# Altium PCB EEM_FMC_Carrier.PcbDoc (part 7 of 19)
Units mm, origin at the board's own origin, x right, y up, seen from the top; angles counter-clockwise.
Board outline 222.9 x 100 mm, 6 copper layers (TopLayer, MidLayer1, MidLayer2, SignalLayer1, Internal Plane 1, BottomLayer), stack 1.528 mm thick; 790 components, 743 nets, 3570 pads, 2277 vias.
Unrouted connection lines stored in the file: 3.
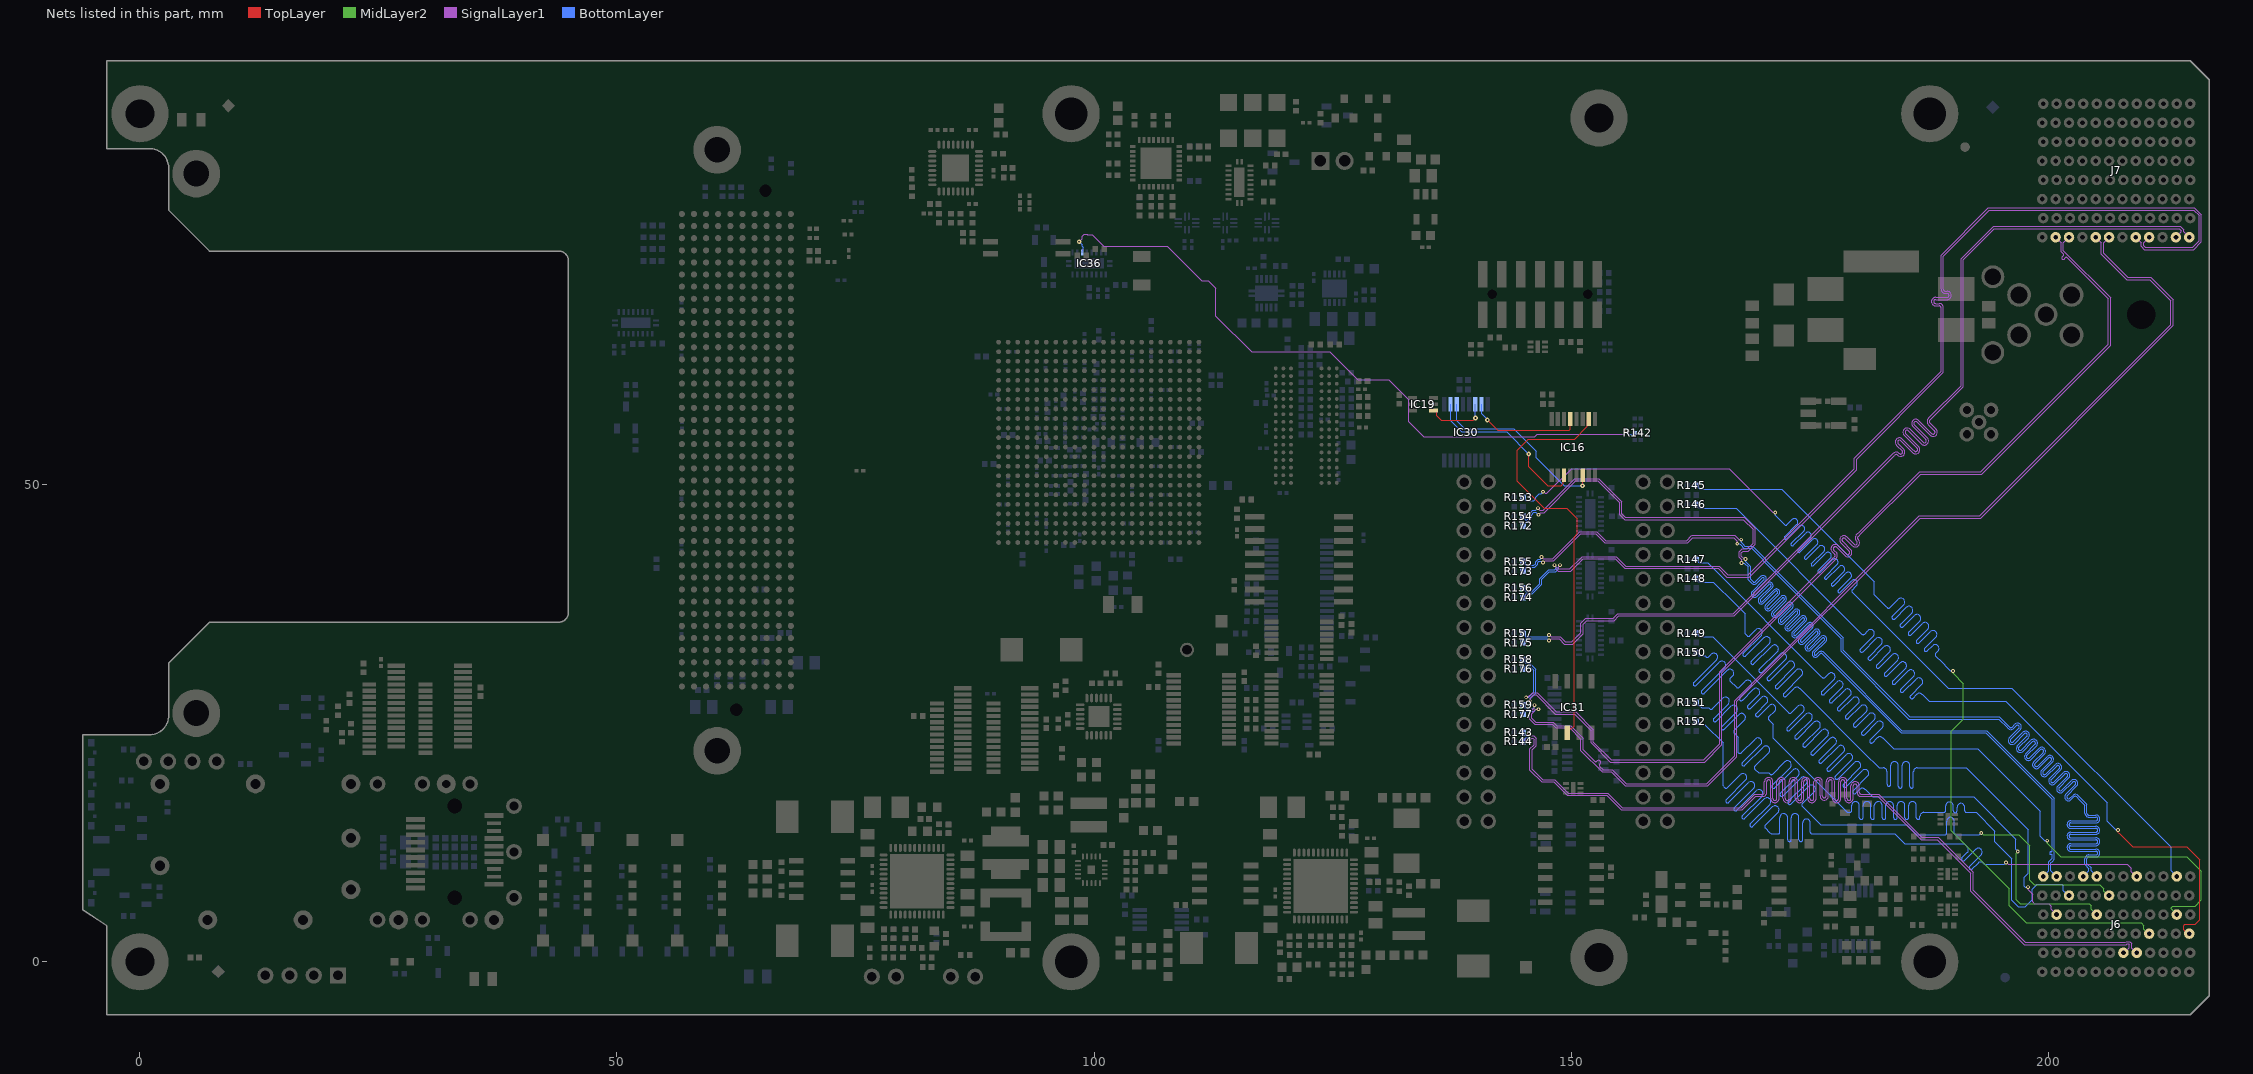
[diagram p9: the nets of this part, all layers, seen from the top]

## Via types
v1: diameter 0.4, hole 0.2, TopLayer to BottomLayer, tented both sides, 1032 vias
v2: diameter 0.5, hole 0.2, TopLayer to BottomLayer, tented both sides, 979 vias
v3: diameter 0.5, hole 0.2, TopLayer to BottomLayer, 162 vias
v4: diameter 0.8, hole 0.5, TopLayer to BottomLayer, tented both sides, 102 vias
v5: diameter 0.6, hole 0.3, TopLayer to BottomLayer, tented both sides, 2 vias

## Nets (pads, with @x,y where several pads share a name; then routed paths per layer and width w, separated by ;. In a path a pad name is that pad's centre, name@x,y a point inside that pad or via, vN(x,y) a via of type N, cw(c..) or ccw(c..) an arc to the next point about the centre after c; other vN are vias at no path point) (continued)
BP_IO.LVDS_N9: J6.L6 R172.1 | length 126.4
  SignalLayer1 w0.11: v1(146.608,46.865) 146.608,46.888 146.809,47.089 147.199,47.089 150.51,50.4 152.825,50.4 155.088,48.137 155.088,46.888 155.612,46.363 168.062,46.363 169.1,45.325 169.1,43.885 168.49,43.275 167.95,43.275 167.633,42.958 167.633,42.392 167.876,42.149 167.876,41.803 v1(167.874,41.801)
  BottomLayer w0.085: R172.1@144.968,45.7 145.215,45.947 145.215,46.044 145.265,46.094 145.442,46.094 145.875,46.527 145.875,46.875 146.102,47.102 146.329,47.102 146.565,46.865 v1(146.608,46.865) ; v1(167.874,41.801) 167.877,41.797 168.151,41.797 168.563,41.386 168.563,40.062 168.85,39.775 168.954,39.671 ccw(c169.206,39.921) 169.456,39.67 170.025,40.239 cw(c170.126,40.138) 170.227,40.239 cw(c170.126,40.138) 170.227,40.037 ; 170.226,40.037 169.001,38.811 ccw(c169.252,38.561) 169.467,38.279 169.471,38.279 170.728,39.536 cw(c170.829,39.435) 170.93,39.536 cw(c170.829,39.435) 170.93,39.334 169.704,38.109 ccw(c169.954,37.858) 170.17,37.576 170.174,37.576 171.431,38.833 cw(c171.532,38.733) 171.633,38.833 cw(c171.532,38.733) 171.632,38.632 ; 171.632,38.631 170.407,37.406 ccw(c170.657,37.155) 170.407,36.904 ccw(c170.657,37.155) 170.872,36.873 170.877,36.873 172.134,38.13 cw(c172.235,38.03) 172.336,38.13 cw(c172.235,38.03) 172.335,37.929 ; 172.335,37.928 171.109,36.703 ccw(c171.36,36.452) 171.575,36.17 171.58,36.17 172.837,37.428 cw(c172.938,37.327) 173.038,37.428 cw(c172.938,37.327) 173.038,37.226 ; 173.038,37.225 171.812,36 ccw(c172.063,35.749) 172.278,35.468 172.283,35.468 173.54,36.725 cw(c173.641,36.624) 173.741,36.725 cw(c173.641,36.624) 173.741,36.523 ; 173.74,36.522 172.515,35.297 ccw(c172.766,35.046) 172.981,34.765 172.985,34.765 174.243,36.022 cw(c174.343,35.921) 174.444,36.022 cw(c174.343,35.921) 174.444,35.82 ; 174.443,35.82 173.218,34.594 ccw(c173.469,34.344) 173.218,34.093 ccw(c173.469,34.344) 173.684,34.062 173.688,34.062 174.945,35.319 cw(c175.046,35.218) 175.147,35.319 cw(c175.046,35.218) 175.147,35.117 ; 175.146,35.117 173.921,33.891 ccw(c174.172,33.641) 174.387,33.359 174.391,33.359 175.648,34.616 cw(c175.749,34.515) 175.85,34.616 cw(c175.749,34.515) 175.85,34.414 174.624,33.189 ccw(c174.874,32.938) 175.09,32.656 175.094,32.656 176.351,33.913 cw(c176.452,33.813) 176.553,33.913 cw(c176.452,33.813) 176.552,33.712 ; 176.552,33.711 175.37,32.529 ccw(c175.62,32.278) 175.871,32.027 176.134,32.29 cw(c176.234,32.189) 176.335,32.29 176.925,31.7 180.275,28.35 184.6,24.025 193.475,24.025 195.625,21.875 200.463,17.037 200.463,12.01 200.463,11.682 cw(c200.321,11.682) 200.321,11.54 200.3,11.54 ccw(c200.3,11.397) 200.157,11.397 ccw(c200.3,11.397) 200.3,11.255 200.321,11.255 cw(c200.321,11.112) 200.463,11.112 200.463,10.856 200.463,10.838 200.094,10.469 200.094,9.544 J6.L6@199.5,8.95
BP_IO.LVDS_N10: J6.I6 R173.1 | length 129.6
  SignalLayer1 w0.11: v1(147.067,41.851) 147.095,41.851 147.276,42.032 148.207,42.032 151.025,44.85 152.615,44.85 153.55,43.915 162.24,43.915 162.775,44.45 167.05,44.45 167.267,44.233 167.401,44.099 167.401,43.843 v1(167.421,43.823)
  BottomLayer w0.085: R173.1@144.968,40.95 145.215,41.197 145.215,41.294 145.265,41.344 145.425,41.344 145.513,41.344 146.194,41.344 146.497,41.647 146.497,41.833 146.641,41.977 146.856,41.977 146.982,41.851 v1(147.067,41.851) ; v1(167.421,43.823) 167.424,43.82 167.699,43.82 167.767,43.751 167.767,43.709 168.125,43.35 168.95,43.35 170.175,42.125 170.175,42.025 178.313,33.887 178.313,32.562 185.425,25.45 194.825,25.45 195.712,24.563 195.774,24.501 195.786,24.489 195.817,24.458 ccw(c196.103,24.744) 196.389,24.458 196.674,24.743 cw(c196.81,24.607) 196.946,24.743 cw(c196.81,24.607) 196.946,24.471 ; 196.945,24.47 195.954,23.479 ccw(c196.24,23.193) 195.954,22.907 ccw(c196.24,23.193) 196.491,22.876 196.495,22.876 197.518,23.899 cw(c197.654,23.763) 197.79,23.899 cw(c197.654,23.763) 197.79,23.627 196.798,22.635 ccw(c197.084,22.349) 197.335,22.032 197.339,22.032 198.362,23.055 cw(c198.498,22.919) 198.634,23.055 cw(c198.498,22.919) 198.634,22.782 197.642,21.79 ccw(c197.928,21.504) 197.642,21.218 ccw(c197.928,21.504) 198.18,21.187 198.183,21.187 199.207,22.21 cw(c199.343,22.074) 199.479,22.21 cw(c199.343,22.074) 199.479,21.938 ; 199.478,21.938 198.487,20.946 ccw(c198.773,20.66) 198.487,20.374 ccw(c198.773,20.66) 199.024,20.343 199.028,20.343 200.051,21.366 cw(c200.187,21.23) 200.323,21.366 cw(c200.187,21.23) 200.323,21.094 ; 200.322,21.093 199.331,20.102 ccw(c199.617,19.816) 199.868,19.499 199.872,19.499 200.895,20.522 cw(c201.031,20.386) 201.167,20.522 cw(c201.031,20.386) 201.167,20.25 ; 201.167,20.249 200.175,19.258 ccw(c200.461,18.972) 200.175,18.686 ccw(c200.461,18.972) 200.712,18.654 200.716,18.654 201.739,19.678 cw(c201.876,19.541) 202.012,19.678 cw(c201.876,19.541) 202.012,19.405 201.02,18.413 ccw(c201.306,18.127) 201.02,17.841 ccw(c201.306,18.127) 201.557,17.81 201.561,17.81 202.584,18.833 cw(c202.72,18.697) 202.856,18.833 cw(c202.72,18.697) 202.856,18.561 201.864,17.569 ccw(c202.15,17.283) 202.401,16.966 202.405,16.966 202.721,17.282 cw(c202.857,17.146) 202.994,17.281 203.212,17.063 203.348,16.927 203.4,16.875 203.863,16.412 203.863,15.725 203.863,15.576 ccw(c204.267,15.576) 204.267,15.172 205.027,15.172 cw(c205.027,14.979) 205.22,14.979 cw(c205.027,14.979) 205.027,14.787 202.39,14.787 ccw(c202.39,14.382) 201.986,14.382 ccw(c202.39,14.382) 202.39,13.978 205.027,13.978 cw(c205.027,13.785) 205.22,13.785 cw(c205.027,13.785) 205.027,13.593 202.39,13.593 ccw(c202.39,13.188) 201.986,13.188 ccw(c202.39,13.188) 202.39,12.784 205.027,12.784 cw(c205.027,12.591) 205.22,12.591 cw(c205.027,12.591) 205.027,12.399 202.39,12.399 ccw(c202.39,11.994) 201.986,11.994 ccw(c202.39,11.994) 202.39,11.59 205.016,11.59 cw(c205.016,11.397) 205.209,11.397 cw(c205.016,11.397) 205.016,11.205 204.267,11.205 ccw(c204.267,10.8) 203.863,10.8 203.863,10.35 203.863,10.212 204.294,9.781 204.294,9.544 J6.I6@203.7,8.95
BP_IO.LVDS_N11: J7.E1 R174.1 | length 112.6
  SignalLayer1 w0.11: v1(148.855,41.575) 148.855,41.547 148.673,41.365 148.673,41.24 148.738,41.176 149.724,41.176 ; 149.725,41.175 149.875,41.175 151.169,42.469 154.756,42.469 155.756,41.469 165.516,41.469 166.423,40.562 168.562,40.562 179.7,51.7 179.7,52.798 188.788,61.886 188.788,68.061 188.788,68.561 ccw(c188.583,68.561) 188.583,68.765 188.211,68.765 cw(c188.211,69.207) 187.769,69.207 cw(c188.211,69.207) 188.211,69.649 189.419,69.649 ccw(c189.419,69.854) 189.624,69.854 ccw(c189.419,69.854) 189.419,70.059 189.23,70.059 cw(c189.23,70.501) 188.788,70.501 188.788,70.675 188.788,74.073 193.757,79.042 215.352,79.042 216.062,78.332 216.062,75.462 215.263,74.663 210.104,74.663 209.782,74.986 209.782,75.369 J7.E1@209.2,75.95
  BottomLayer w0.085: R174.1@144.968,38.2 145.215,38.447 145.215,38.49 145.319,38.594 145.957,38.594 146.925,39.562 146.925,40.075 147.738,40.888 148.387,40.888 148.661,41.162 148.661,41.376 148.855,41.57 v1(148.855,41.575)
BP_IO.LVDS_N12: J7.B1 R175.1 | length 111.2
  SignalLayer1 w0.11: v1(147.7,33.669) 147.728,33.669 147.909,33.851 148.764,33.851 149.309,33.306 150.173,33.306 151.262,34.394 151.262,35.375 151.662,35.775 154.547,35.775 155.022,36.25 167.085,36.25 183.432,52.596 183.953,53.118 cw(c184.098,52.973) 184.244,53.118 ccw(c184.556,53.431) 184.868,53.118 ccw(c184.556,53.431) 184.868,53.743 184.282,54.329 cw(c184.427,54.474) 184.282,54.619 cw(c184.427,54.474) 184.572,54.619 ; 184.572,54.619 185.812,53.379 ccw(c186.125,53.691) 186.438,53.379 ccw(c186.125,53.691) 186.472,53.965 186.472,53.969 185.075,55.366 cw(c185.221,55.51) 185.076,55.655 cw(c185.221,55.51) 185.366,55.655 186.727,54.294 ; 186.281,56.57 ccw(c186.136,56.425) 185.991,56.57 ccw(c186.136,56.425) 185.99,56.281 187.387,54.884 187.387,54.88 cw(c187.04,54.606) 187.353,54.294 cw(c187.04,54.606) 186.727,54.294 ; 186.282,56.569 187.642,55.209 ccw(c187.955,55.521) 188.268,55.209 ccw(c187.955,55.521) 188.302,55.795 188.302,55.799 187.613,56.488 cw(c187.758,56.633) 187.613,56.778 187.736,56.901 191.125,60.29 191.125,73.6 194.383,76.858 213.748,76.858 213.981,76.625 213.981,76.532 J7.B1@213.4,75.95
  BottomLayer w0.085: R175.1@144.968,33.45 145.215,33.697 145.215,33.794 145.265,33.844 145.705,33.844 145.724,33.863 147.501,33.863 147.695,33.669 v1(147.7,33.669)
BP_IO.LVDS_N13: J7.K1 R176.1 | length 112.2
  SignalLayer1 w0.11: v1(145.298,27.725) 145.35,27.777 145.542,27.777 145.977,28.212 146.438,28.212 148.463,26.187 150.488,26.187 152.337,24.338 152.337,23.038 154.2,21.175 163.9,21.175 165.575,22.85 165.575,30.4 177.506,42.331 177.628,42.453 ccw(c177.483,42.598) 177.628,42.744 ; 177.628,42.744 177.379,42.993 cw(c177.691,43.305) 177.379,43.618 cw(c177.691,43.305) 178.004,43.618 178.862,42.76 ccw(c179.007,42.905) 179.152,42.76 ccw(c179.007,42.905) 179.152,43.05 178.294,43.908 cw(c178.606,44.22) 178.294,44.533 cw(c178.606,44.22) 178.919,44.533 179.672,43.78 ccw(c179.817,43.924) 179.962,43.78 ccw(c179.817,43.924) 179.962,44.069 179.916,44.116 cw(c180.228,44.428) 179.916,44.741 180.3,45.125 186.537,51.362 192.937,51.362 206.325,64.75 206.325,69.5 202.075,73.75 202.037,73.788 ccw(c201.927,73.679) 201.817,73.788 201.693,73.664 cw(c201.583,73.774) 201.474,73.664 cw(c201.583,73.774) 201.474,73.883 201.598,74.008 ccw(c201.489,74.117) 201.598,74.227 201.381,74.443 201.381,74.605 201.381,75.369 J7.K1@200.8,75.95
  BottomLayer w0.085: R176.1@144.968,30.7 145.215,30.947 145.215,31.044 145.265,31.094 145.562,31.094 145.825,30.831 146.1,30.556 146.1,28.253 145.576,27.728 145.301,27.728 v1(145.298,27.725)
BP_IO.LVDS_N14: J7.H1 R177.1 | length 111.5
  SignalLayer1 w0.11: v1@146.578,26.456 146.321,26.456 145.887,26.022 145.887,25.538 146.3,25.125 148.15,25.125 148.513,24.762 149.961,24.762 151.275,23.448 151.275,22.225 152.227,21.273 152.265,21.235 152.45,21.05 ccw(c152.595,21.195) 152.74,21.05 152.751,21.061 cw(c152.896,20.916) 153.041,21.061 cw(c152.896,20.916) 153.041,20.771 153.03,20.76 ccw(c153.175,20.615) 153.03,20.47 153.32,20.18 153.35,20.15 153.367,20.15 154.325,20.15 155.8,18.675 164.225,18.675 167.138,21.588 167.138,27.387 186.487,46.737 192.825,46.737 212.888,66.8 212.888,69.287 210.675,71.5 208.252,71.5 205.581,74.17 205.581,75.369 J7.H1@205,75.95
  BottomLayer w0.085: R177.1@144.968,25.95 145.215,26.197 145.215,26.24 145.265,26.289 145.385,26.289 146.136,26.289 146.261,26.414 146.32,26.472 146.594,26.472 v1(146.597,26.476)
BP_IO.LVDS_N15: J6.F2 R144.1 | length 110
  SignalLayer1 w0.11: v1(145.598,23.275) 145.676,23.275 145.858,23.457 145.998,23.457 146.125,23.33 146.125,22.75 145.688,22.313 145.688,20.102 146.927,18.863 148.202,18.863 149.615,17.45 153.74,17.45 155.265,15.925 167.935,15.925 169.343,17.332 169.9,17.332 170.074,17.332 ccw(c170.074,17.774) 170.516,17.774 170.516,18.869 cw(c170.721,18.869) 170.721,19.074 cw(c170.721,18.869) 170.926,18.869 170.926,17.124 ccw(c171.368,17.124) 171.368,16.682 ccw(c171.368,17.124) 171.809,17.124 171.809,18.869 cw(c172.014,18.869) 172.014,19.074 cw(c172.014,18.869) 172.219,18.869 172.219,17.124 ccw(c172.661,17.124) 172.661,16.682 ccw(c172.661,17.124) 173.103,17.124 173.103,18.869 cw(c173.308,18.869) 173.308,19.074 cw(c173.308,18.869) 173.513,18.869 173.513,17.124 ccw(c173.955,17.124) 173.955,16.682 ccw(c173.955,17.124) 174.397,17.124 174.397,18.869 cw(c174.602,18.869) 174.602,19.074 cw(c174.602,18.869) 174.807,18.869 174.807,17.124 ccw(c175.249,17.124) 175.249,16.682 ccw(c175.249,17.124) 175.691,17.124 175.691,18.869 cw(c175.896,18.869) 175.896,19.074 cw(c175.896,18.869) 176.101,18.869 176.101,17.398 ccw(c176.543,17.398) 176.543,16.956 ccw(c176.543,17.398) 176.985,17.398 176.985,18.869 cw(c177.19,18.869) 177.19,19.074 cw(c177.19,18.869) 177.395,18.869 177.395,17.124 ccw(c177.837,17.124) 177.837,16.682 ccw(c177.837,17.124) 178.279,17.124 178.279,18.869 cw(c178.484,18.869) 178.484,19.074 cw(c178.484,18.869) 178.689,18.869 178.689,17.124 ccw(c179.131,17.124) 179.131,16.682 ccw(c179.131,17.124) 179.573,17.124 179.573,18.433 cw(c179.778,18.433) 179.778,18.638 cw(c179.778,18.433) 179.983,18.433 179.983,17.774 ccw(c180.425,17.774) 180.425,17.332 180.988,17.332 182.157,17.332 186.69,12.8 188.375,12.8 191.9,9.275 191.9,7.4 197.495,1.805 208.199,1.805 208.284,1.889 208.449,1.889 208.513,1.825 208.513,1.482 207.982,0.95 J6.F2@207.9,0.95
  BottomLayer w0.085: R144.1@144.97,23.1 145.217,23.347 145.217,23.419 145.267,23.469 145.399,23.469 145.593,23.275 v1(145.598,23.275)
BP_IO.LVDS_P0: J6.D3 R145.1 | length 101.4
  MidLayer2 w0.11: v1(190.047,30.499) 190.067,30.48 190.067,30.223 191.119,29.17 191.119,25.419 189.85,24.15 189.85,13.725 195.934,7.641 195.934,5.866 197.713,4.087 209.748,4.087 210.037,3.798 210.037,3.438 210.525,2.95 J6.D3@210.6,2.95
  BottomLayer w0.085: R145.1@163.15,49.95 163.397,49.703 163.397,49.606 ; 163.385,49.618 163.447,49.556 172.082,49.556 181.775,39.863 181.775,38.497 183.05,37.222 183.124,37.148 183.155,37.117 ccw(c183.291,37.253) 183.428,37.117 184.297,37.986 cw(c184.582,37.699) 184.868,37.985 cw(c184.582,37.699) 184.899,37.448 184.899,37.444 183.693,36.238 ccw(c183.829,36.102) 183.692,35.965 ccw(c183.829,36.102) 183.965,35.965 ; 183.965,35.966 185.141,37.142 cw(c185.426,36.855) 185.712,37.141 cw(c185.426,36.855) 185.743,36.604 185.743,36.6 184.537,35.393 ccw(c184.673,35.257) 184.537,35.121 ccw(c184.673,35.257) 184.809,35.121 ; 184.81,35.122 185.986,36.298 cw(c186.27,36.011) 186.556,36.297 cw(c186.27,36.011) 186.588,35.759 186.588,35.756 185.381,34.549 ccw(c185.517,34.413) 185.381,34.277 ; 185.381,34.277 ccw(c185.517,34.413) 185.653,34.277 ; 185.654,34.277 186.83,35.453 cw(c187.115,35.166) 187.401,35.452 cw(c187.115,35.166) 187.432,34.915 187.432,34.911 186.225,33.705 ccw(c186.361,33.569) 186.225,33.433 ccw(c186.361,33.569) 186.498,33.433 ; 186.498,33.433 187.674,34.609 cw(c187.959,34.322) 188.245,34.608 cw(c187.959,34.322) 188.276,34.071 188.276,34.067 187.07,32.861 ccw(c187.206,32.724) 187.07,32.588 ccw(c187.206,32.724) 187.342,32.588 ; 187.342,32.589 187.893,33.139 cw(c188.178,32.852) 188.464,33.138 cw(c188.178,32.852) 188.464,32.566 188.221,32.323 ccw(c188.357,32.187) 188.221,32.051 188.504,31.768 188.578,31.694 189.77,30.503 190.044,30.503 v1(190.047,30.499)
BP_IO.LVDS_P1: J6.A3 R146.1 | length 109.6
  TopLayer w0.085: v1(207.348,13.825) 207.351,13.822 207.351,13.547 207.443,13.455 ; 207.445,13.455 208.863,12.037 214.563,12.037 214.625,11.975 214.95,11.65 215.1,11.5 215.409,11.191 215.905,10.696 215.905,4.43 215.413,3.938 214.349,3.938 214.206,3.795 214.206,3.375 214.631,2.95 J6.A3@214.8,2.95
  BottomLayer w0.085: R146.1@163.15,47.95 163.391,47.709 163.391,47.606 163.441,47.556 167.294,47.556 180.388,34.462 180.493,34.357 ccw(c180.629,34.494) 180.765,34.357 181.113,34.706 cw(c181.398,34.419) 181.684,34.705 cw(c181.398,34.419) 181.715,34.168 181.715,34.164 180.339,32.787 ccw(c180.475,32.651) 180.339,32.515 ccw(c180.475,32.651) 180.611,32.515 ; 180.611,32.516 181.958,33.862 cw(c182.243,33.575) 182.529,33.861 cw(c182.243,33.575) 182.56,33.323 182.56,33.32 181.183,31.943 ccw(c181.319,31.807) 181.183,31.671 ccw(c181.319,31.807) 181.455,31.671 ; 181.456,31.671 182.802,33.018 cw(c183.087,32.73) 183.373,33.016 cw(c183.087,32.73) 183.404,32.479 183.404,32.475 182.027,31.099 ccw(c182.163,30.963) 182.027,30.826 ccw(c182.163,30.963) 182.299,30.826 ; 182.3,30.827 183.646,32.173 cw(c183.931,31.886) 184.217,32.172 cw(c183.931,31.886) 184.248,31.635 184.248,31.631 182.871,30.254 ccw(c183.008,30.118) 182.871,29.982 ccw(c183.008,30.118) 183.144,29.982 ; 183.144,29.983 184.491,31.329 cw(c184.775,31.042) 185.061,31.328 cw(c184.775,31.042) 185.092,30.791 185.092,30.787 183.716,29.41 ccw(c183.852,29.274) 183.716,29.138 ccw(c183.852,29.274) 183.988,29.138 185.335,30.485 cw(c185.62,30.198) 185.906,30.484 cw(c185.62,30.198) 185.937,29.946 185.937,29.943 184.56,28.566 ccw(c184.696,28.43) 184.56,28.294 ccw(c184.696,28.43) 184.832,28.294 ; 184.833,28.294 186.179,29.64 cw(c186.464,29.353) 186.75,29.639 cw(c186.464,29.353) 186.781,29.102 186.781,29.098 185.586,27.903 ccw(c185.722,27.767) 185.586,27.631 ccw(c185.722,27.767) 185.858,27.631 186.253,28.025 cw(c186.539,27.739) 186.79,28.056 186.794,28.056 186.824,28.026 ; 186.825,28.025 187.475,27.375 187.538,27.312 195.551,27.312 206.2,16.663 206.2,14.725 207.077,13.848 207.325,13.848 v1(207.348,13.825)
BP_IO.LVDS_P2: J6.B4 R147.1 | length 105.8
  MidLayer2 w0.11: v1(199.923,12.7) 199.943,12.68 199.943,12.423 201.329,11.037 214.553,11.037 216.087,9.503 216.087,6.48 215.432,5.825 213.06,5.825 212.9,5.665 212.9,5.55 J6.B4@213.5,4.95
  BottomLayer w0.085: R147.1@163.15,42.2 163.397,41.953 163.397,41.856 ; 163.385,41.868 163.416,41.837 164.313,41.837 176.244,29.906 176.318,29.832 176.349,29.801 ccw(c176.485,29.937) 176.622,29.801 176.995,30.174 cw(c177.28,29.887) 177.566,30.173 cw(c177.28,29.887) 177.597,29.636 177.597,29.632 176.274,28.309 ccw(c176.41,28.173) 176.274,28.037 ccw(c176.41,28.173) 176.546,28.037 ; 176.547,28.037 177.839,29.33 cw(c178.124,29.043) 178.41,29.329 cw(c178.124,29.043) 178.441,28.792 178.441,28.788 177.118,27.465 ccw(c177.254,27.328) 177.118,27.192 ccw(c177.254,27.328) 177.39,27.192 178.684,28.486 cw(c178.969,28.198) 179.255,28.484 cw(c178.969,28.198) 179.286,27.947 179.286,27.943 177.962,26.62 ccw(c178.099,26.484) 177.962,26.348 ccw(c178.099,26.484) 178.235,26.348 ; 178.235,26.349 179.528,27.641 cw(c179.813,27.354) 180.099,27.64 cw(c179.813,27.354) 180.13,27.103 180.13,27.099 178.807,25.776 ccw(c178.943,25.64) 178.807,25.504 ccw(c178.943,25.64) 179.079,25.504 ; 179.08,25.504 180.372,26.797 cw(c180.657,26.51) 180.943,26.796 cw(c180.657,26.51) 180.974,26.259 180.974,26.255 179.651,24.932 ccw(c179.787,24.796) 179.651,24.659 ccw(c179.787,24.796) 179.923,24.659 ; 179.924,24.66 181.217,25.953 cw(c181.501,25.666) 181.787,25.952 cw(c181.501,25.666) 181.819,25.414 181.819,25.411 180.495,24.087 ccw(c180.631,23.951) 180.495,23.815 ; 180.495,23.815 ccw(c180.631,23.951) 180.768,23.815 ; 180.768,23.816 182.061,25.108 cw(c182.346,24.821) 182.632,25.107 cw(c182.346,24.821) 182.663,24.57 182.663,24.566 181.353,23.257 ccw(c181.489,23.121) 181.353,22.985 ; 181.353,22.985 ccw(c181.489,23.121) 181.626,22.985 182.109,23.468 cw(c182.395,23.182) 182.647,23.499 182.65,23.499 182.681,23.469 ; 182.681,23.468 183.368,22.782 183.442,22.708 183.7,22.45 183.825,22.325 192.625,22.325 197.6,17.35 197.75,17.2 199.162,15.788 199.162,13.186 199.645,12.703 199.919,12.703 v1(199.923,12.7)
BP_IO.LVDS_P3: J6.K4 R148.1 | length 107.8
  SignalLayer1 w0.11: v1(197.899,7.824) 197.919,7.805 197.919,7.548 198.4,7.067 198.4,6.275 198.58,6.095 200.072,6.095 200.318,5.848 200.318,5.5 200.868,4.95 J6.K4@200.9,4.95
  BottomLayer w0.085: R148.1@163.15,40.2 163.397,39.953 163.397,39.856 163.447,39.806 164.919,39.806 167.15,37.575 167.3,37.425 168.262,36.463 168.262,34.363 168.363,34.262 168.468,34.157 ccw(c168.604,34.294) 168.74,34.157 169.373,34.79 cw(c169.658,34.503) 169.944,34.789 cw(c169.658,34.503) 169.975,34.252 169.975,34.248 168.06,32.334 ccw(c168.196,32.198) 168.06,32.062 ccw(c168.196,32.198) 168.333,32.062 ; 168.333,32.062 170.217,33.946 cw(c170.502,33.659) 170.788,33.945 cw(c170.502,33.659) 170.819,33.408 170.819,33.404 168.905,31.49 ccw(c169.041,31.354) 168.905,31.217 ccw(c169.041,31.354) 169.177,31.217 ; 169.177,31.218 171.061,33.102 cw(c171.346,32.815) 171.632,33.101 cw(c171.346,32.815) 171.663,32.564 171.663,32.56 169.749,30.645 ccw(c169.885,30.509) 169.749,30.373 ccw(c169.885,30.509) 170.021,30.373 ; 170.022,30.374 171.906,32.258 cw(c172.19,31.97) 172.476,32.256 cw(c172.19,31.97) 172.508,31.719 172.508,31.715 170.593,29.801 ccw(c170.729,29.665) 170.593,29.529 ccw(c170.729,29.665) 170.865,29.529 ; 170.866,29.529 172.75,31.413 cw(c173.035,31.126) 173.321,31.412 cw(c173.035,31.126) 173.352,30.875 173.352,30.871 171.437,28.957 ccw(c171.574,28.821) 171.437,28.685 ccw(c171.574,28.821) 171.71,28.685 173.594,30.569 cw(c173.879,30.282) 174.165,30.568 cw(c173.879,30.282) 174.196,30.031 174.196,30.027 172.282,28.113 ccw(c172.418,27.976) 172.282,27.84 ccw(c172.418,27.976) 172.554,27.84 ; 172.555,27.841 173.383,28.67 cw(c173.669,28.384) 173.92,28.701 173.924,28.701 173.955,28.67 ; 173.955,28.67 174.421,28.204 180.6,22.025 180.75,21.875 182.233,20.392 182.288,20.337 182.719,20.337 cw(c182.719,19.933) 183.124,19.933 183.124,18.593 ccw(c183.316,18.593) 183.316,18.4 ccw(c183.316,18.593) 183.509,18.593 183.509,20.583 cw(c183.913,20.583) 183.913,20.987 cw(c183.913,20.583) 184.318,20.583 184.318,18.391 ccw(c184.51,18.391) 184.51,18.199 ccw(c184.51,18.391) 184.703,18.391 184.703,20.583 cw(c185.107,20.583) 185.107,20.987 cw(c185.107,20.583) 185.512,20.583 185.512,18.391 ccw(c185.704,18.391) 185.704,18.199 ccw(c185.704,18.391) 185.897,18.391 185.897,19.933 cw(c186.301,19.933) 186.301,20.337 186.45,20.337 191.438,20.337 195.725,16.05 195.875,15.9 197.925,13.85 197.925,9.275 197.521,8.871 197.521,7.929 197.622,7.828 197.896,7.828 v1(197.899,7.824)
BP_IO.LVDS_P4: J6.H4 R149.1 | length 106.7
  MidLayer2 w0.11: v1(196.828,11.575) 196.828,11.547 196.646,11.366 196.646,6.529 197.08,6.095 204.315,6.095 204.55,5.86 204.55,5.5 J6.H4@205.1,4.95
  BottomLayer w0.085: R149.1@163.15,34.45 163.397,34.203 163.397,34.106 163.447,34.056 164.844,34.056 172.703,26.197 172.808,26.092 ccw(c172.944,26.228) 173.08,26.092 173.773,26.785 cw(c174.058,26.498) 174.344,26.784 cw(c174.058,26.498) 174.375,26.247 174.375,26.243 172.654,24.522 ccw(c172.79,24.386) 172.654,24.25 ccw(c172.79,24.386) 172.926,24.25 174.617,25.941 cw(c174.902,25.654) 175.188,25.94 cw(c174.902,25.654) 175.219,25.403 175.219,25.399 173.498,23.678 ccw(c173.634,23.542) 173.498,23.406 ccw(c173.634,23.542) 173.771,23.406 ; 173.771,23.406 175.461,25.097 cw(c175.746,24.81) 176.032,25.096 cw(c175.746,24.81) 176.063,24.558 176.063,24.555 174.343,22.834 ccw(c174.479,22.698) 174.343,22.562 ccw(c174.479,22.698) 174.615,22.562 ; 174.615,22.562 176.306,24.252 cw(c176.591,23.965) 176.877,24.251 cw(c176.591,23.965) 176.908,23.714 176.908,23.71 175.187,21.99 ccw(c175.323,21.853) 175.187,21.717 ccw(c175.323,21.853) 175.459,21.717 177.15,23.408 cw(c177.435,23.121) 177.721,23.407 cw(c177.435,23.121) 177.752,22.87 177.752,22.866 176.031,21.145 ccw(c176.167,21.009) 176.031,20.873 ccw(c176.167,21.009) 176.303,20.873 177.994,22.564 cw(c178.279,22.277) 178.565,22.563 cw(c178.279,22.277) 178.596,22.026 178.596,22.022 176.875,20.301 ccw(c177.012,20.165) 176.875,20.029 ccw(c177.012,20.165) 177.148,20.029 ; 177.148,20.029 178.839,21.72 cw(c179.123,21.432) 179.409,21.718 cw(c179.123,21.432) 179.44,21.181 179.44,21.177 177.72,19.457 ccw(c177.856,19.321) 177.72,19.185 ccw(c177.856,19.321) 177.992,19.184 ; 177.993,19.185 179.683,20.875 cw(c179.968,20.588) 180.254,20.874 cw(c179.968,20.588) 180.285,20.337 180.285,20.333 178.564,18.612 ccw(c178.7,18.476) 178.564,18.34 ccw(c178.7,18.476) 178.836,18.34 ; 178.837,18.341 180.527,20.031 cw(c180.812,19.744) 181.098,20.03 cw(c180.812,19.744) 181.129,19.493 181.129,19.489 179.58,17.94 ccw(c179.717,17.804) 179.58,17.668 ccw(c179.717,17.804) 179.853,17.668 180.256,18.072 cw(c180.542,17.786) 180.793,18.103 180.797,18.103 180.827,18.072 ; 180.828,18.072 181.306,17.594 181.613,17.287 192.209,17.287 196.634,12.863 196.634,12.281 196.634,11.774 196.828,11.58 v1(196.828,11.575)
BP_IO.LVDS_P5: J6.J5 R150.1 | length 109.2
  BottomLayer w0.085: 163.132,28.986 cw(c162.996,29.122) 162.86,28.986 cw(c162.996,29.122) 162.86,29.259 165.287,31.686 165.287,31.69 ccw(c164.97,31.941) 165.256,32.227 ccw(c164.97,31.941) 164.685,32.228 164.424,31.967 cw(c164.288,32.103) 164.152,31.967 164.121,31.998 164.063,32.056 164.031,32.056 163.447,32.056 163.397,32.106 163.397,32.203 R150.1@163.15,32.45 ; 163.133,28.987 165.53,31.384 cw(c165.814,31.097) 166.1,31.383 cw(c165.814,31.097) 166.132,30.845 166.132,30.842 163.704,28.414 ccw(c163.84,28.278) 163.704,28.142 ; 163.704,28.142 ccw(c163.84,28.278) 163.976,28.142 ; 163.977,28.143 166.374,30.539 cw(c166.659,30.252) 166.945,30.538 cw(c166.659,30.252) 166.976,30.001 166.976,29.997 166.685,29.706 ccw(c166.821,29.57) 166.685,29.434 166.961,29.158 167.035,29.084 167.247,28.872 167.352,28.767 ccw(c167.488,28.903) 167.624,28.767 168.25,29.393 cw(c168.535,29.106) 168.821,29.392 cw(c168.535,29.106) 168.852,28.854 168.852,28.851 167.703,27.701 ccw(c167.839,27.565) 167.703,27.429 ccw(c167.839,27.565) 167.975,27.429 ; 167.975,27.43 169.094,28.549 cw(c169.379,28.261) 169.665,28.547 cw(c169.379,28.261) 169.696,28.01 169.696,28.006 168.547,26.857 ccw(c168.683,26.721) 168.547,26.585 ccw(c168.683,26.721) 168.819,26.585 ; 168.82,26.585 169.939,27.704 cw(c170.224,27.417) 170.51,27.703 cw(c170.224,27.417) 170.541,27.166 170.541,27.162 169.391,26.013 ccw(c169.527,25.877) 169.391,25.74 ccw(c169.527,25.877) 169.663,25.74 ; 169.664,25.741 170.783,26.86 cw(c171.068,26.573) 171.354,26.859 cw(c171.068,26.573) 171.385,26.322 171.385,26.318 170.729,25.662 ccw(c170.865,25.526) 170.729,25.39 171.212,24.907 171.212,24.612 171.212,23.413 174.875,19.75 175.025,19.6 178.963,15.662 179.075,15.662 179.224,15.662 ccw(c179.224,15.854) 179.416,15.854 179.416,16.388 cw(c179.821,16.388) 179.821,16.793 cw(c179.821,16.388) 180.225,16.388 180.225,15.111 ccw(c180.418,15.111) 180.418,14.919 ccw(c180.418,15.111) 180.61,15.111 180.61,16.388 cw(c181.015,16.388) 181.015,16.793 cw(c181.015,16.388) 181.419,16.388 181.419,15.111 ccw(c181.612,15.111) 181.612,14.919 ccw(c181.612,15.111) 181.804,15.111 181.804,16.388 cw(c182.209,16.388) 182.209,16.793 cw(c182.209,16.388) 182.613,16.388 182.613,15.111 ccw(c182.806,15.111) 182.806,14.919 ccw(c182.806,15.111) 182.998,15.111 182.998,16.388 cw(c183.403,16.388) 183.403,16.793 cw(c183.403,16.388) 183.807,16.388 183.807,15.111 ccw(c184,15.111) 184,14.919 ccw(c184,15.111) 184.192,15.111 184.192,16.388 cw(c184.597,16.388) 184.597,16.793 cw(c184.597,16.388) 185.001,16.388 185.001,15.111 ccw(c185.194,15.111) 185.194,14.919 ccw(c185.194,15.111) 185.386,15.111 185.386,16.388 cw(c185.79,16.388) 185.79,16.793 cw(c185.791,16.388) 186.195,16.388 186.195,15.111 ccw(c186.387,15.111) 186.387,14.919 ccw(c186.388,15.111) 186.58,15.111 186.58,15.258 cw(c186.984,15.258) 186.984,15.662 187.842,15.662 188.925,15.662 189.074,15.662 ccw(c189.074,15.854) 189.266,15.854 189.266,16.345 cw(c189.671,16.345) 189.671,16.749 cw(c189.671,16.345) 190.075,16.345 190.075,15.817 ccw(c190.268,15.817) 190.268,15.624 ccw(c190.268,15.817) 190.46,15.817 190.46,16.196 cw(c190.865,16.196) 190.865,16.6 cw(c190.865,16.196) 191.269,16.196 191.269,15.854 ccw(c191.462,15.854) 191.462,15.662 192.009,15.662 192.463,15.662 194.425,13.7 194.425,12.6 196.2,10.825 196.2,6.687 196.2,6.475 196.9,5.775 197.638,5.775 198.363,6.5 198.363,7.613 198.887,8.137 201.432,8.137 201.606,7.963 201.606,7.475 202.131,6.95 J6.J5@202.2,6.95
BP_IO.LVDS_P6: J6.G5 R151.1 | length 105.2
  MidLayer2 w0.11: v1(193,13.5) 193.028,13.5 193.209,13.319 196.917,13.319 198.075,12.16 198.075,8.575 198.575,8.075 205.417,8.075 205.818,7.673 205.818,7.375 206.243,6.95 J6.G5@206.4,6.95
  BottomLayer w0.085: R151.1@163.15,27.2 163.397,26.953 163.397,26.856 163.447,26.806 163.535,26.806 163.704,26.637 164.438,26.637 164.45,26.625 164.524,26.551 164.555,26.52 ccw(c164.691,26.656) 164.827,26.52 165.918,27.61 cw(c166.202,27.323) 166.488,27.609 cw(c166.202,27.323) 166.519,27.072 166.519,27.068 164.942,25.491 ccw(c165.078,25.355) 164.942,25.219 ccw(c165.078,25.355) 165.214,25.219 ; 165.215,25.219 166.762,26.766 cw(c167.047,26.479) 167.333,26.765 cw(c167.047,26.479) 167.364,26.228 167.364,26.224 165.786,24.647 ccw(c165.923,24.51) 165.786,24.374 ccw(c165.923,24.51) 166.059,24.374 167.606,25.922 cw(c167.891,25.634) 168.177,25.921 cw(c167.891,25.634) 168.208,25.383 168.208,25.38 167.088,24.259 ccw(c167.224,24.123) 167.088,23.987 167.388,23.687 167.462,23.613 167.55,23.525 167.55,22.075 167.55,21.925 167.58,21.895 ccw(c167.716,22.031) 167.852,21.895 169.308,23.351 cw(c169.593,23.064) 169.879,23.35 cw(c169.593,23.064) 169.91,22.813 169.91,22.809 167.96,20.858 ccw(c168.096,20.722) 167.96,20.586 ccw(c168.096,20.722) 168.232,20.586 ; 168.232,20.587 170.152,22.507 cw(c170.437,22.219) 170.723,22.505 cw(c170.437,22.219) 170.754,21.968 170.754,21.964 169.269,20.479 ccw(c169.405,20.343) 169.269,20.206 169.663,19.812 169.972,19.812 170.738,19.813 170.763,19.788 170.868,19.682 ccw(c171.004,19.819) 171.14,19.682 172.405,20.948 cw(c172.69,20.661) 172.976,20.947 cw(c172.69,20.661) 173.007,20.41 173.007,20.406 171.105,18.503 ccw(c171.241,18.367) 171.105,18.231 ccw(c171.241,18.367) 171.377,18.231 173.25,20.104 cw(c173.534,19.817) 173.82,20.103 cw(c173.534,19.817) 173.852,19.565 173.852,19.562 171.949,17.659 ccw(c172.085,17.523) 171.949,17.387 ccw(c172.085,17.523) 172.221,17.387 ; 172.222,17.387 174.094,19.26 cw(c174.379,18.972) 174.665,19.258 cw(c174.379,18.972) 174.696,18.721 174.696,18.717 172.793,16.815 ccw(c172.929,16.679) 172.793,16.543 ccw(c172.929,16.679) 173.065,16.543 ; 173.066,16.543 174.938,18.415 cw(c175.223,18.128) 175.509,18.414 cw(c175.223,18.128) 175.54,17.877 175.54,17.873 174.245,16.578 ccw(c174.381,16.441) 174.245,16.305 174.64,15.91 176.199,14.351 ; 176.2,14.35 185.175,14.35 185.7,13.825 185.85,13.675 186.219,13.306 189.037,13.306 189.185,13.306 ccw(c189.185,13.498) 189.378,13.498 189.378,14.729 cw(c189.782,14.729) 189.782,15.134 cw(c189.782,14.729) 190.187,14.729 190.187,13.498 ccw(c190.379,13.498) 190.379,13.306 191.85,13.306 192.801,13.306 192.995,13.5 v1(193,13.5)
BP_IO.LVDS_P7: J6.E6 R152.1 | length 105.9
  SignalLayer1 w0.11: v1(195.598,10.406) 195.626,10.406 195.807,10.225 208.323,10.225 208.725,9.823 208.725,9.419 209.194,8.95 J6.E6@209.3,8.95
  BottomLayer w0.085: R152.1@163.15,25.2 163.397,24.953 163.397,24.925 163.447,24.875 164.025,24.875 165.937,22.963 165.937,18.438 166.012,18.362 166.117,18.257 ccw(c166.254,18.394) 166.39,18.257 167.738,19.606 cw(c168.023,19.319) 168.309,19.605 cw(c168.023,19.319) 168.34,19.068 168.34,19.064 166.267,16.991 ccw(c166.403,16.855) 166.267,16.719 ccw(c166.403,16.855) 166.539,16.719 ; 166.54,16.719 168.583,18.762 cw(c168.868,18.475) 169.154,18.761 cw(c168.868,18.475) 169.185,18.224 169.185,18.22 167.111,16.146 ccw(c167.247,16.01) 167.111,15.874 ccw(c167.247,16.01) 167.384,15.874 ; 167.384,15.875 169.427,17.918 cw(c169.712,17.63) 169.998,17.916 cw(c169.712,17.63) 170.029,17.379 170.029,17.375 167.956,15.302 ccw(c168.092,15.166) 167.956,15.03 ccw(c168.092,15.166) 168.228,15.03 ; 168.229,15.031 170.271,17.073 cw(c170.556,16.786) 170.842,17.072 cw(c170.556,16.786) 170.873,16.535 170.873,16.531 168.8,14.458 ccw(c168.936,14.322) 168.8,14.186 ccw(c168.936,14.322) 169.072,14.186 ; 169.073,14.186 171.116,16.229 cw(c171.4,15.942) 171.686,16.228 cw(c171.4,15.942) 171.717,15.691 171.717,15.687 170.339,14.308 ccw(c170.475,14.172) 170.339,14.036 170.792,13.582 170.963,13.412 171.55,13.412 171.699,13.412 ccw(c171.699,13.604) 171.891,13.604 171.891,15.12 cw(c172.296,15.12) 172.296,15.525 cw(c172.296,15.12) 172.7,15.12 172.7,12.8 ccw(c172.893,12.8) 172.893,12.607 ccw(c172.893,12.8) 173.085,12.8 173.085,15.12 cw(c173.49,15.12) 173.49,15.525 cw(c173.49,15.12) 173.894,15.12 173.894,12.8 ccw(c174.087,12.8) 174.087,12.607 ccw(c174.087,12.8) 174.279,12.8 174.279,14.558 cw(c174.684,14.558) 174.684,14.963 cw(c174.684,14.558) 175.088,14.558 175.088,13.604 ccw(c175.281,13.604) 175.281,13.412 175.807,13.412 183.95,13.412 185,12.362 191.029,12.362 191.089,12.362 191.213,12.362 191.356,12.219 191.544,12.031 cw(c191.258,11.745) 191.544,11.459 190.981,10.896 ccw(c191.117,10.76) 190.981,10.624 ccw(c191.117,10.76) 191.253,10.624 192.411,11.781 cw(c192.697,11.495) 192.983,11.781 cw(c192.697,11.495) 193.014,11.244 193.014,11.24 191.786,10.012 ccw(c191.922,9.876) 191.786,9.74 ccw(c191.922,9.876) 192.058,9.74 192.66,10.342 cw(c192.946,10.056) 193.232,10.342 193.263,10.311 193.288,10.287 193.337,10.237 193.363,10.212 195.399,10.212 195.593,10.406 v1(195.598,10.406)
BP_IO.LVDS_P8: J6.B6 R153.1 | length 129.5
  SignalLayer1 w0.11: v1(147.073,49.275) 147.101,49.275 147.282,49.094 147.462,49.094 150.056,51.687 166.588,51.687 168.967,49.308 171.151,47.124 171.368,47.124 v1(171.408,47.085)
  BottomLayer w0.085: R153.1@144.968,48.7 145.215,48.453 145.215,48.356 145.265,48.306 146.069,48.306 146.288,48.525 146.288,48.719 146.65,49.081 146.874,49.081 147.068,49.275 v1(147.073,49.275) ; v1(171.408,47.085) 171.411,47.081 171.411,46.807 171.515,46.703 171.909,46.309 172.321,45.896 172.395,45.823 172.427,45.791 ccw(c172.527,45.892) 172.628,45.791 173.209,46.372 173.213,46.372 cw(c173.429,46.091) 173.679,46.341 cw(c173.429,46.091) 173.68,45.841 172.392,44.553 ccw(c172.492,44.451) 172.391,44.351 ccw(c172.492,44.451) 172.593,44.351 173.912,45.67 173.916,45.67 cw(c174.131,45.388) 174.382,45.638 cw(c174.131,45.388) 174.383,45.138 173.094,43.849 ccw(c173.195,43.749) 173.094,43.648 ccw(c173.195,43.749) 173.296,43.648 174.584,44.936 cw(c174.834,44.685) 175.085,44.936 cw(c174.834,44.685) 175.116,44.47 175.116,44.465 173.797,43.146 ccw(c173.898,43.046) 173.797,42.945 ccw(c173.898,43.046) 173.999,42.945 ; 173.999,42.946 175.287,44.234 cw(c175.537,43.982) 175.788,44.233 cw(c175.537,43.982) 175.819,43.767 175.819,43.762 174.5,42.444 ccw(c174.601,42.343) 174.5,42.242 ccw(c174.601,42.343) 174.702,42.242 ; 174.702,42.243 175.99,43.531 cw(c176.24,43.279) 176.491,43.53 cw(c176.24,43.279) 176.522,43.064 176.522,43.06 175.203,41.741 ccw(c175.304,41.64) 175.203,41.539 ccw(c175.304,41.64) 175.405,41.54 176.693,42.828 cw(c176.943,42.576) 177.194,42.827 cw(c176.943,42.576) 177.225,42.361 177.225,42.357 175.906,41.038 ccw(c176.006,40.937) 175.906,40.836 ccw(c176.006,40.937) 176.107,40.837 ; 176.108,40.837 177.396,42.125 cw(c177.646,41.873) 177.896,42.124 cw(c177.646,41.873) 177.927,41.658 177.927,41.654 176.609,40.335 ccw(c176.709,40.234) 176.609,40.134 ccw(c176.709,40.234) 176.81,40.134 178.099,41.422 cw(c178.349,41.171) 178.599,41.421 cw(c178.349,41.171) 178.63,40.955 178.63,40.951 177.311,39.632 ccw(c177.412,39.531) 177.311,39.431 ccw(c177.412,39.531) 177.513,39.431 ; 177.514,39.431 178.802,40.719 cw(c179.051,40.468) 179.302,40.718 cw(c179.051,40.468) 179.333,40.253 179.333,40.248 178.014,38.929 ccw(c178.115,38.829) 178.014,38.728 ccw(c178.115,38.829) 178.216,38.728 179.422,39.934 cw(c179.671,39.682) 179.922,39.933 cw(c179.671,39.682) 179.922,39.431 179.455,38.964 ccw(c179.556,38.864) 179.455,38.763 179.748,38.47 179.821,38.396 189.531,28.687 196.213,28.687 196.275,28.625 196.9,28 197.05,27.85 212.906,11.994 212.906,9.544 J6.B6@213.5,8.95
BP_IO.LVDS_P9: J6.K6 R154.1 | length 126.4
  SignalLayer1 w0.11: v1(146.523,47.55) 146.523,47.527 146.725,47.326 147.101,47.326 150.412,50.637 152.923,50.637 155.325,48.236 155.325,46.986 155.71,46.6 168.16,46.6 169.337,45.423 169.337,43.787 168.588,43.038 168.048,43.038 167.87,42.859 167.87,42.491 168.08,42.28 168.243,42.28 v1(168.298,42.225)
  BottomLayer w0.085: R154.1@144.968,46.7 145.215,46.453 145.215,46.356 145.265,46.306 145.354,46.306 145.663,46.615 145.663,46.963 146.014,47.314 146.329,47.314 146.523,47.508 v1(146.523,47.55) ; v1(168.298,42.225) 168.301,42.222 168.301,41.947 168.775,41.474 168.775,40.15 169,39.925 169.105,39.82 ccw(c169.206,39.921) 169.307,39.82 169.876,40.39 cw(c170.126,40.138) 170.377,40.389 cw(c170.126,40.138) 170.408,39.923 170.408,39.919 169.151,38.662 ccw(c169.252,38.561) 169.151,38.46 ccw(c169.252,38.561) 169.353,38.46 170.579,39.687 cw(c170.829,39.435) 171.08,39.686 cw(c170.829,39.435) 171.111,39.22 171.111,39.216 169.854,37.959 ccw(c169.954,37.858) 169.854,37.757 ccw(c169.954,37.858) 170.055,37.757 171.282,38.984 cw(c171.532,38.733) 171.783,38.983 cw(c171.532,38.733) 171.814,38.517 171.814,38.513 170.556,37.256 ccw(c170.657,37.155) 170.556,37.054 ccw(c170.657,37.155) 170.758,37.055 ; 170.759,37.055 171.985,38.281 cw(c172.235,38.03) 172.485,38.28 cw(c172.235,38.03) 172.517,37.815 172.517,37.81 171.259,36.553 ccw(c171.36,36.452) 171.259,36.351 ccw(c171.36,36.452) 171.461,36.352 172.688,37.578 cw(c172.938,37.327) 173.188,37.578 cw(c172.938,37.327) 173.219,37.112 173.219,37.107 171.962,35.85 ccw(c172.063,35.749) 171.962,35.649 ccw(c172.063,35.749) 172.164,35.649 ; 172.165,35.649 173.391,36.876 cw(c173.641,36.624) 173.891,36.875 cw(c173.641,36.624) 173.922,36.409 173.922,36.404 172.665,35.147 ccw(c172.766,35.046) 172.665,34.946 ccw(c172.766,35.046) 172.867,34.946 174.094,36.173 cw(c174.343,35.921) 174.594,36.172 cw(c174.343,35.921) 174.625,35.706 174.625,35.702 173.368,34.444 ccw(c173.469,34.344) 173.368,34.243 ccw(c173.469,34.344) 173.57,34.243 ; 173.57,34.244 174.796,35.47 cw(c175.046,35.218) 175.297,35.469 cw(c175.046,35.218) 175.328,35.003 175.328,34.999 174.071,33.742 ccw(c174.172,33.641) 174.071,33.54 ccw(c174.172,33.641) 174.273,33.54 175.499,34.767 cw(c175.749,34.515) 176,34.766 cw(c175.749,34.515) 176.031,34.3 176.031,34.296 174.774,33.039 ccw(c174.874,32.938) 174.774,32.837 ccw(c174.874,32.938) 174.975,32.837 176.202,34.064 cw(c176.452,33.813) 176.703,34.063 cw(c176.452,33.813) 176.734,33.597 176.734,33.593 175.52,32.379 ccw(c175.62,32.278) 175.52,32.177 ccw(c175.62,32.278) 175.721,32.177 175.984,32.44 cw(c176.234,32.189) 176.485,32.44 177.075,31.85 184.688,24.237 193.563,24.237 195.625,22.175 195.775,22.025 200.675,17.125 200.675,10.75 200.475,10.55 200.306,10.381 200.306,9.544 J6.K6@200.9,8.95
BP_IO.LVDS_P10: J6.H6 R155.1 | length 130
  SignalLayer1 w0.11: v1(146.905,42.429) 146.955,42.429 147.114,42.269 148.109,42.269 150.927,45.087 152.713,45.087 153.648,44.152 162.142,44.152 162.677,44.687 ; 162.7,44.687 167.148,44.687 167.504,44.331 167.569,44.267 167.825,44.267 v1(167.845,44.247)
  BottomLayer w0.085: R155.1@144.968,41.95 145.215,41.703 145.215,41.606 145.265,41.556 146.106,41.556 146.285,41.735 146.285,41.921 146.553,42.189 146.75,42.189 146.905,42.343 v1(146.905,42.429) ; v1(167.845,44.247) 167.849,44.244 167.849,43.969 167.979,43.839 167.979,43.796 168.213,43.562 169.038,43.562 170.387,42.213 170.387,42.113 178.525,33.975 178.525,32.65 185.513,25.662 194.913,25.662 195.862,24.713 195.936,24.639 195.967,24.608 ccw(c196.103,24.744) 196.239,24.608 196.525,24.894 cw(c196.81,24.607) 197.096,24.893 cw(c196.81,24.607) 197.127,24.356 197.127,24.352 196.104,23.329 ccw(c196.24,23.193) 196.104,23.057 ; 196.104,23.057 ccw(c196.24,23.193) 196.376,23.057 ; 196.377,23.057 197.369,24.05 cw(c197.654,23.763) 197.94,24.049 cw(c197.654,23.763) 197.971,23.512 197.971,23.508 196.948,22.485 ccw(c197.084,22.349) 196.948,22.213 ccw(c197.084,22.349) 197.22,22.213 198.214,23.206 cw(c198.498,22.919) 198.784,23.205 cw(c198.498,22.919) 198.815,22.667 198.815,22.664 197.792,21.641 ccw(c197.928,21.504) 197.792,21.368 ccw(c197.928,21.504) 198.065,21.368 ; 198.065,21.369 199.058,22.362 cw(c199.343,22.074) 199.629,22.36 cw(c199.343,22.074) 199.66,21.823 199.66,21.819 198.637,20.796 ccw(c198.773,20.66) 198.637,20.524 ccw(c198.773,20.66) 198.909,20.524 ; 198.909,20.525 199.902,21.517 cw(c200.187,21.23) 200.473,21.516 cw(c200.187,21.23) 200.504,20.979 200.504,20.975 199.481,19.952 ccw(c199.617,19.816) 199.481,19.68 ccw(c199.617,19.816) 199.753,19.68 ; 199.754,19.68 200.746,20.673 cw(c201.031,20.386) 201.317,20.672 cw(c201.031,20.386) 201.348,20.135 201.348,20.131 200.325,19.108 ccw(c200.461,18.972) 200.325,18.835 ; 200.325,18.835 ccw(c200.461,18.972) 200.597,18.835 ; 200.598,18.836 201.591,19.829 cw(c201.876,19.541) 202.162,19.827 cw(c201.876,19.541) 202.193,19.29 202.193,19.286 201.169,18.263 ccw(c201.306,18.127) 201.169,17.991 ccw(c201.306,18.127) 201.442,17.991 202.435,18.984 cw(c202.72,18.697) 203.006,18.983 cw(c202.72,18.697) 203.037,18.446 203.037,18.442 202.014,17.419 ccw(c202.15,17.283) 202.014,17.147 ccw(c202.15,17.283) 202.286,17.147 ; 202.287,17.147 202.571,17.432 cw(c202.857,17.146) 203.108,17.463 203.112,17.463 203.142,17.433 ; 203.143,17.432 203.361,17.213 203.488,17.087 203.498,17.077 204.075,16.5 204.075,15.725 204.075,15.576 ccw(c204.267,15.576) 204.267,15.384 205.027,15.384 cw(c205.027,14.979) 205.432,14.979 cw(c205.027,14.979) 205.027,14.575 202.39,14.575 ccw(c202.39,14.382) 202.198,14.382 ccw(c202.39,14.382) 202.39,14.19 205.027,14.19 cw(c205.027,13.785) 205.432,13.785 cw(c205.027,13.785) 205.027,13.381 202.39,13.381 ccw(c202.39,13.188) 202.198,13.188 ccw(c202.39,13.188) 202.39,12.996 205.027,12.996 cw(c205.027,12.591) 205.432,12.591 cw(c205.027,12.591) 205.027,12.187 202.39,12.187 ccw(c202.39,11.994) 202.198,11.994 ccw(c202.39,11.994) 202.39,11.802 205.016,11.802 cw(c205.016,11.397) 205.421,11.397 cw(c205.016,11.397) 205.016,10.993 204.267,10.993 ccw(c204.267,10.8) 204.075,10.8 204.075,10.35 204.075,10.3 204.506,9.869 204.506,9.544 J6.H6@205.1,8.95
BP_IO.LVDS_P11: J7.D1 R156.1 | length 111.5
  SignalLayer1 w0.11: v1(148.255,41.575) 148.255,41.547 148.436,41.365 148.436,41.142 148.64,40.939 149.626,40.939 ; 149.627,40.938 149.973,40.938 151.268,42.232 154.657,42.232 155.658,41.232 165.418,41.232 166.325,40.325 168.66,40.325 179.937,51.602 179.937,52.7 189.025,61.788 189.025,68.061 189.025,68.561 ccw(c188.583,68.561) 188.583,69.002 188.211,69.002 cw(c188.211,69.207) 188.006,69.207 cw(c188.211,69.207) 188.211,69.412 189.419,69.412 ccw(c189.419,69.854) 189.861,69.854 ccw(c189.419,69.854) 189.419,70.296 189.23,70.296 cw(c189.23,70.501) 189.025,70.501 189.025,70.675 189.025,73.975 193.855,78.805 215.254,78.805 215.825,78.234 215.825,75.56 215.165,74.9 210.202,74.9 210.019,75.084 210.019,75.369 J7.D1@210.6,75.95
  BottomLayer w0.085: R156.1@144.968,39.2 145.215,38.953 145.215,38.885 145.294,38.806 145.869,38.806 146.713,39.65 146.713,40.163 147.65,41.1 148.299,41.1 148.449,41.25 148.449,41.376 148.255,41.57 v1(148.255,41.575)
BP_IO.LVDS_P12: J7.A1 R157.1 | length 111.6
  SignalLayer1 w0.11: v1(147.7,34.269) 147.728,34.269 147.909,34.088 148.862,34.088 149.407,33.543 150.075,33.543 151.025,34.493 151.025,35.473 151.564,36.012 154.449,36.012 154.924,36.487 166.987,36.487 183.264,52.764 183.786,53.286 cw(c184.098,52.973) 184.372,53.32 184.376,53.32 184.411,53.286 ccw(c184.556,53.431) 184.701,53.286 ccw(c184.556,53.431) 184.701,53.575 184.114,54.162 cw(c184.427,54.474) 184.115,54.787 cw(c184.427,54.474) 184.74,54.787 185.791,53.736 185.981,53.545 ccw(c186.125,53.691) 186.27,53.546 ccw(c186.125,53.691) 186.269,53.837 ; 184.909,55.197 186.269,53.837 ; 184.909,55.197 cw(c185.221,55.51) 184.908,55.823 cw(c185.221,55.51) 185.494,55.857 185.499,55.857 186.896,54.46 ccw(c187.04,54.606) 187.185,54.461 ccw(c187.04,54.606) 187.184,54.752 185.824,56.112 cw(c186.136,56.425) 185.823,56.738 cw(c186.136,56.425) 186.409,56.772 186.414,56.772 187.811,55.375 ccw(c187.955,55.521) 188.1,55.376 ccw(c187.955,55.521) 188.099,55.667 187.446,56.32 cw(c187.758,56.633) 187.446,56.946 187.568,57.068 190.888,60.388 190.888,73.698 194.285,77.095 213.847,77.095 214.218,76.723 214.218,76.532 J7.A1@214.8,75.95
  BottomLayer w0.085: R157.1@144.968,34.45 145.215,34.203 145.215,34.106 145.265,34.056 145.617,34.056 145.636,34.075 147.501,34.075 147.695,34.269 v1(147.7,34.269)
BP_IO.LVDS_P13: J7.J1 R158.1 | length 112.3
  SignalLayer1 w0.11: v1(145.722,27.301) 145.778,27.356 145.728,27.406 145.728,27.628 146.075,27.975 146.34,27.975 148.365,25.95 150.39,25.95 152.1,24.24 152.1,22.94 154.102,20.938 163.998,20.938 165.812,22.752 165.812,30.302 177.673,42.163 177.796,42.286 ccw(c177.483,42.598) 177.831,42.872 177.831,42.876 177.546,43.16 cw(c177.691,43.305) 177.546,43.45 cw(c177.691,43.305) 177.836,43.45 178.694,42.592 ccw(c179.007,42.905) 179.319,42.592 ccw(c179.007,42.905) 179.319,43.217 178.461,44.075 cw(c178.606,44.22) 178.461,44.365 cw(c178.606,44.22) 178.751,44.365 179.504,43.612 ccw(c179.817,43.924) 180.13,43.612 ccw(c179.817,43.924) 180.13,44.237 180.083,44.283 cw(c180.228,44.428) 180.083,44.573 180.468,44.957 186.635,51.125 193.035,51.125 206.562,64.652 206.562,69.598 201.618,74.542 201.618,75.369 J7.J1@202.2,75.95
  BottomLayer w0.085: R158.1@144.968,31.7 145.215,31.452 145.215,31.356 145.265,31.306 145.65,31.306 146.312,30.644 146.312,28.165 145.726,27.578 145.726,27.304 v1(145.722,27.301)
BP_IO.LVDS_P14: J7.G1 R159.1 | length 111.9
  SignalLayer1 w0.11: v1@146.153,26.88 146.153,26.624 145.65,26.12 145.65,25.44 146.202,24.888 148.052,24.888 148.415,24.525 149.863,24.525 151.038,23.35 151.038,22.127 153.252,19.913 154.227,19.913 155.702,18.438 164.323,18.438 167.375,21.489 167.375,27.289 186.585,46.5 192.923,46.5 213.125,66.702 213.125,69.385 210.773,71.737 208.35,71.737 205.818,74.269 205.818,75.369 J7.G1@206.4,75.95
  BottomLayer w0.085: R159.1@144.968,26.95 145.215,26.703 145.215,26.551 145.265,26.501 145.473,26.501 146.049,26.501 146.17,26.622 146.17,26.897 v1(146.173,26.9)
BP_IO.LVDS_P15: J6.E2 R143.1 | length 110.4
  SignalLayer1 w0.11: v1(145.598,23.95) 145.601,23.95 145.858,23.694 146.096,23.694 146.362,23.428 146.362,22.652 145.925,22.215 145.925,20.2 147.025,19.1 148.3,19.1 149.713,17.687 153.838,17.687 155.363,16.162 167.837,16.162 169.244,17.569 169.9,17.569 170.074,17.569 ccw(c170.074,17.774) 170.279,17.774 170.279,18.869 cw(c170.721,18.869) 170.721,19.311 cw(c170.721,18.869) 171.163,18.869 171.163,17.124 ccw(c171.368,17.124) 171.368,16.919 ccw(c171.368,17.124) 171.573,17.124 171.573,18.869 cw(c172.014,18.869) 172.014,19.311 cw(c172.014,18.869) 172.456,18.869 172.456,17.124 ccw(c172.661,17.124) 172.661,16.919 ccw(c172.661,17.124) 172.866,17.124 172.866,18.869 cw(c173.308,18.869) 173.308,19.311 cw(c173.308,18.869) 173.75,18.869 173.75,17.124 ccw(c173.955,17.124) 173.955,16.919 ccw(c173.955,17.124) 174.16,17.124 174.16,18.869 cw(c174.602,18.869) 174.602,19.311 cw(c174.602,18.869) 175.044,18.869 175.044,17.124 ccw(c175.249,17.124) 175.249,16.919 ccw(c175.249,17.124) 175.454,17.124 175.454,18.869 cw(c175.896,18.869) 175.896,19.311 cw(c175.896,18.869) 176.338,18.869 176.338,17.398 ccw(c176.543,17.398) 176.543,17.193 ccw(c176.543,17.398) 176.748,17.398 176.748,18.869 cw(c177.19,18.869) 177.19,19.311 cw(c177.19,18.869) 177.632,18.869 177.632,17.124 ccw(c177.837,17.124) 177.837,16.919 ccw(c177.837,17.124) 178.042,17.124 178.042,18.869 cw(c178.484,18.869) 178.484,19.311 cw(c178.484,18.869) 178.926,18.869 178.926,17.124 ccw(c179.131,17.124) 179.131,16.919 ccw(c179.131,17.124) 179.336,17.124 179.336,18.433 cw(c179.778,18.433) 179.778,18.875 cw(c179.778,18.433) 180.22,18.433 180.22,17.774 ccw(c180.425,17.774) 180.425,17.569 180.988,17.569 182.256,17.569 186.788,13.037 188.473,13.037 192.137,9.373 192.137,7.498 197.593,2.042 208.101,2.042 208.186,2.126 208.547,2.126 208.75,1.923 208.75,1.419 209.218,0.95 J6.E2@209.3,0.95
  BottomLayer w0.085: R143.1@144.97,24.05 145.217,23.803 145.217,23.731 145.267,23.681 145.399,23.681 145.598,23.88 v1(145.598,23.95)
BP_JTAG.TCK: IC16.3 IC30.10 | length 18.1
  TopLayer w0.125: v2(145.573,53.225) 145.573,51.9 147.548,49.925 148.973,49.925 149.209,50.161 149.209,50.936 IC16.3@149.273,51
  BottomLayer w0.125: IC30.10@137.373,58.45 137.373,56.727 138.55,55.55 143.248,55.55 v2(145.573,53.225)
BP_JTAG.TDI: IC16.13 IC30.15 | length 12.2
  TopLayer w0.1: v2(141.225,56.8) 142.325,55.7 149.8,55.7 149.923,55.823 IC16.13@149.923,56.9
  BottomLayer w0.125: IC30.15@140.623,58.45 140.623,57.452 141.225,56.85 v2(141.225,56.8)
BP_JTAG.TDO: IC16.10 IC31.2 | length 43.4
  TopLayer w0.125: IC31.2@149.613,24 149.613,24.177 149.85,24.414 150.027,24.414 150.315,24.702 150.315,44.517 150.673,44.875 150.673,46.45 149.573,47.55 147.175,47.55 144.348,50.377 144.348,53.648 145.5,54.8 150.379,54.8 151.711,56.131 151.711,56.738 IC16.10@151.873,56.9
BP_JTAG.TMS: IC16.6 IC30.11 | length 19.2
  TopLayer w0.125: v2(151.2,49.9) 151.223,49.923 IC16.6@151.223,51
  BottomLayer w0.125: IC30.11@138.023,58.45 138.023,56.727 138.85,55.9 143.975,55.9 146.375,53.5 146.375,52.825 149.3,49.9 v2(151.2,49.9)
BP_JTAG.TRSTn: IC19.1 IC30.14 | length 6.6
  TopLayer w0.125: IC19.1@135.598,57.8 135.775,57.8 135.912,57.663 135.912,57.256 136.418,56.75 139.739,56.75 139.989,57 v2(140,57)
  BottomLayer w0.125: IC30.14@139.973,58.45 139.973,57.027 v2(140,57)
BP_MGT.Rx_N: IC36.14 R142.1 | length 72.5
  SignalLayer1 w0.11: v2(98.448,75.475) 98.486,75.475 98.779,75.768 98.779,76.036 98.983,76.239 99.27,76.239 99.272,76.237 99.798,76.237 101.01,75.025 107.675,75.025 111.3,71.4 112,71.4 112.787,70.613 112.787,67.688 116.55,63.925 124.725,63.925 127.65,61 130.873,61 132.975,58.898 132.975,56.635 134.548,55.062 146.212,55.062 146.444,55.294 155.557,55.294 v2(155.889,55.625)
  BottomLayer w0.085: v2(98.448,75.475) 98.456,75.475 98.792,75.14 98.792,74.981 98.892,74.881 98.892,74.657 98.842,74.607 98.83,74.607 98.748,74.525 IC36.14@98.748,74.35 ; v2(155.889,55.625) 155.942,55.572 155.942,55.331 155.992,55.281 156.263,55.281 156.346,55.198 156.396,55.198 156.648,55.45 R142.1@156.668,55.45